# Altium PCB PCB2.PcbDoc
Units mm, origin at the board's own origin, x right, y up, seen from the top; angles counter-clockwise.
Board outline 152.4 x 101.6 mm, 2 copper layers (Top Layer, Bottom Layer); 15 components, 16 nets, 79 pads, 0 vias.
Unrouted connection lines stored in the file: 1.
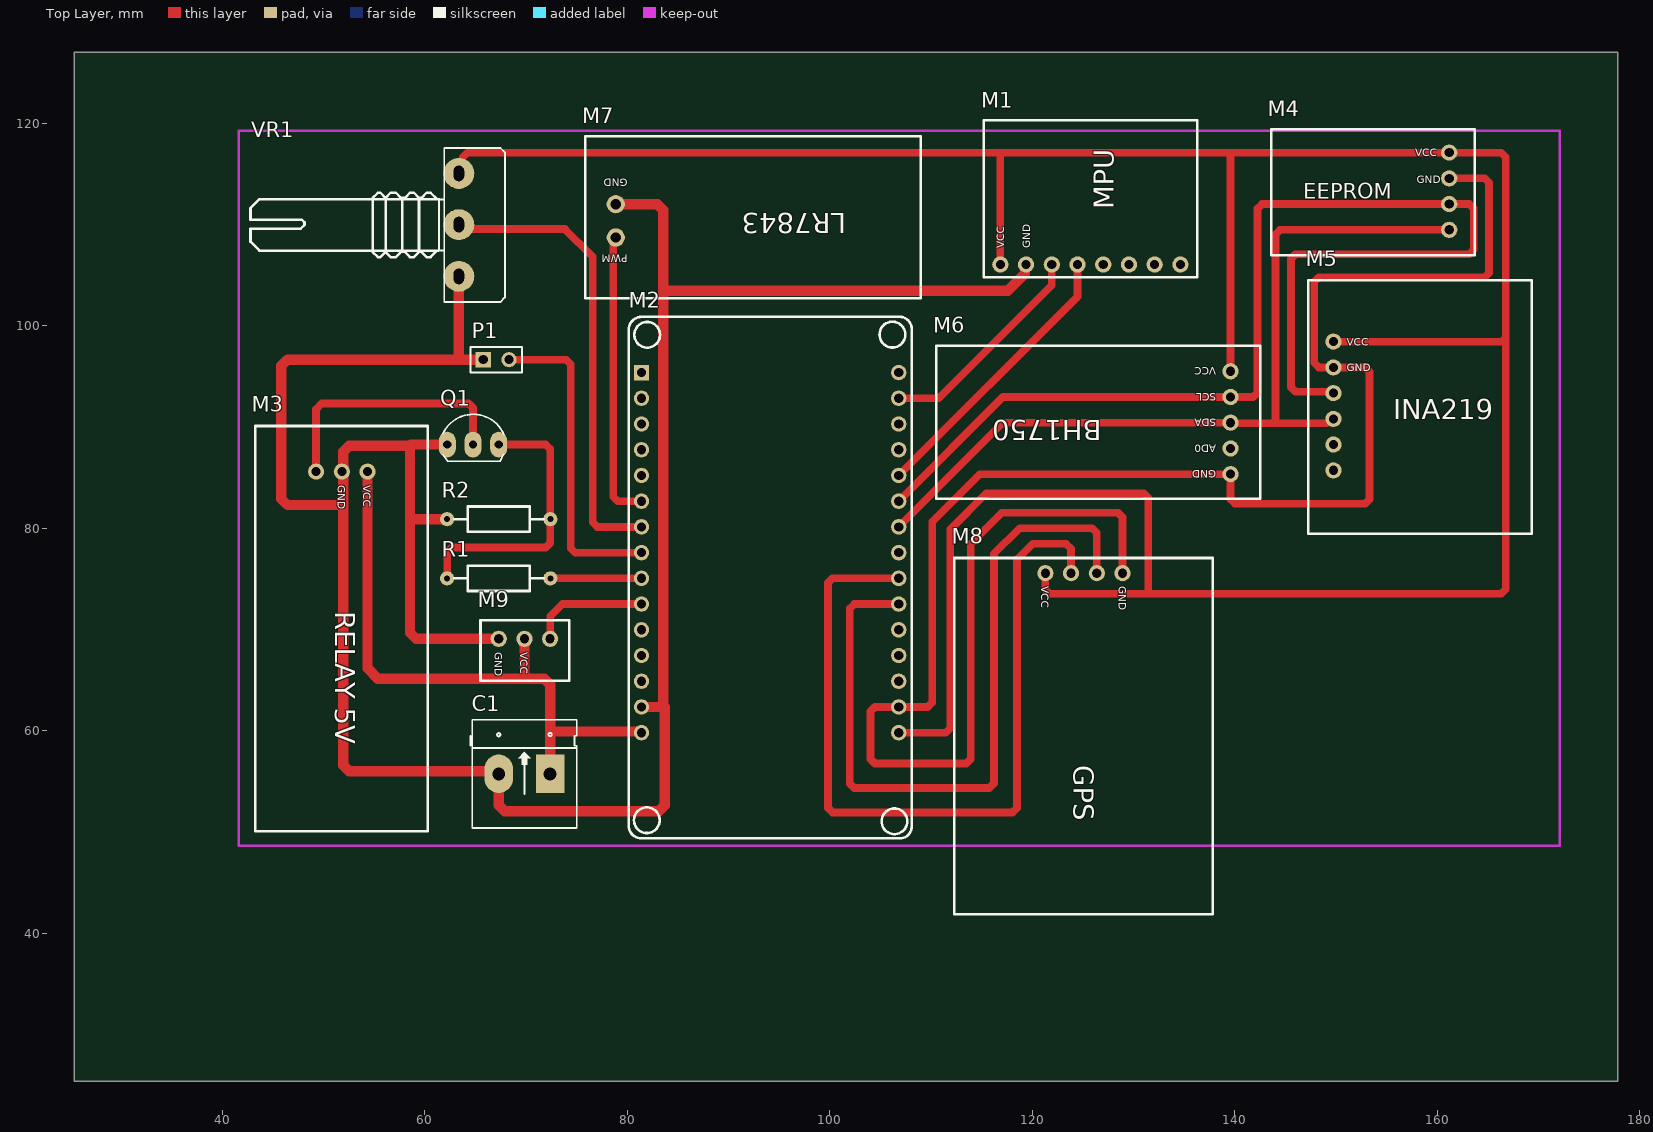
[diagram p0: Top Layer view]
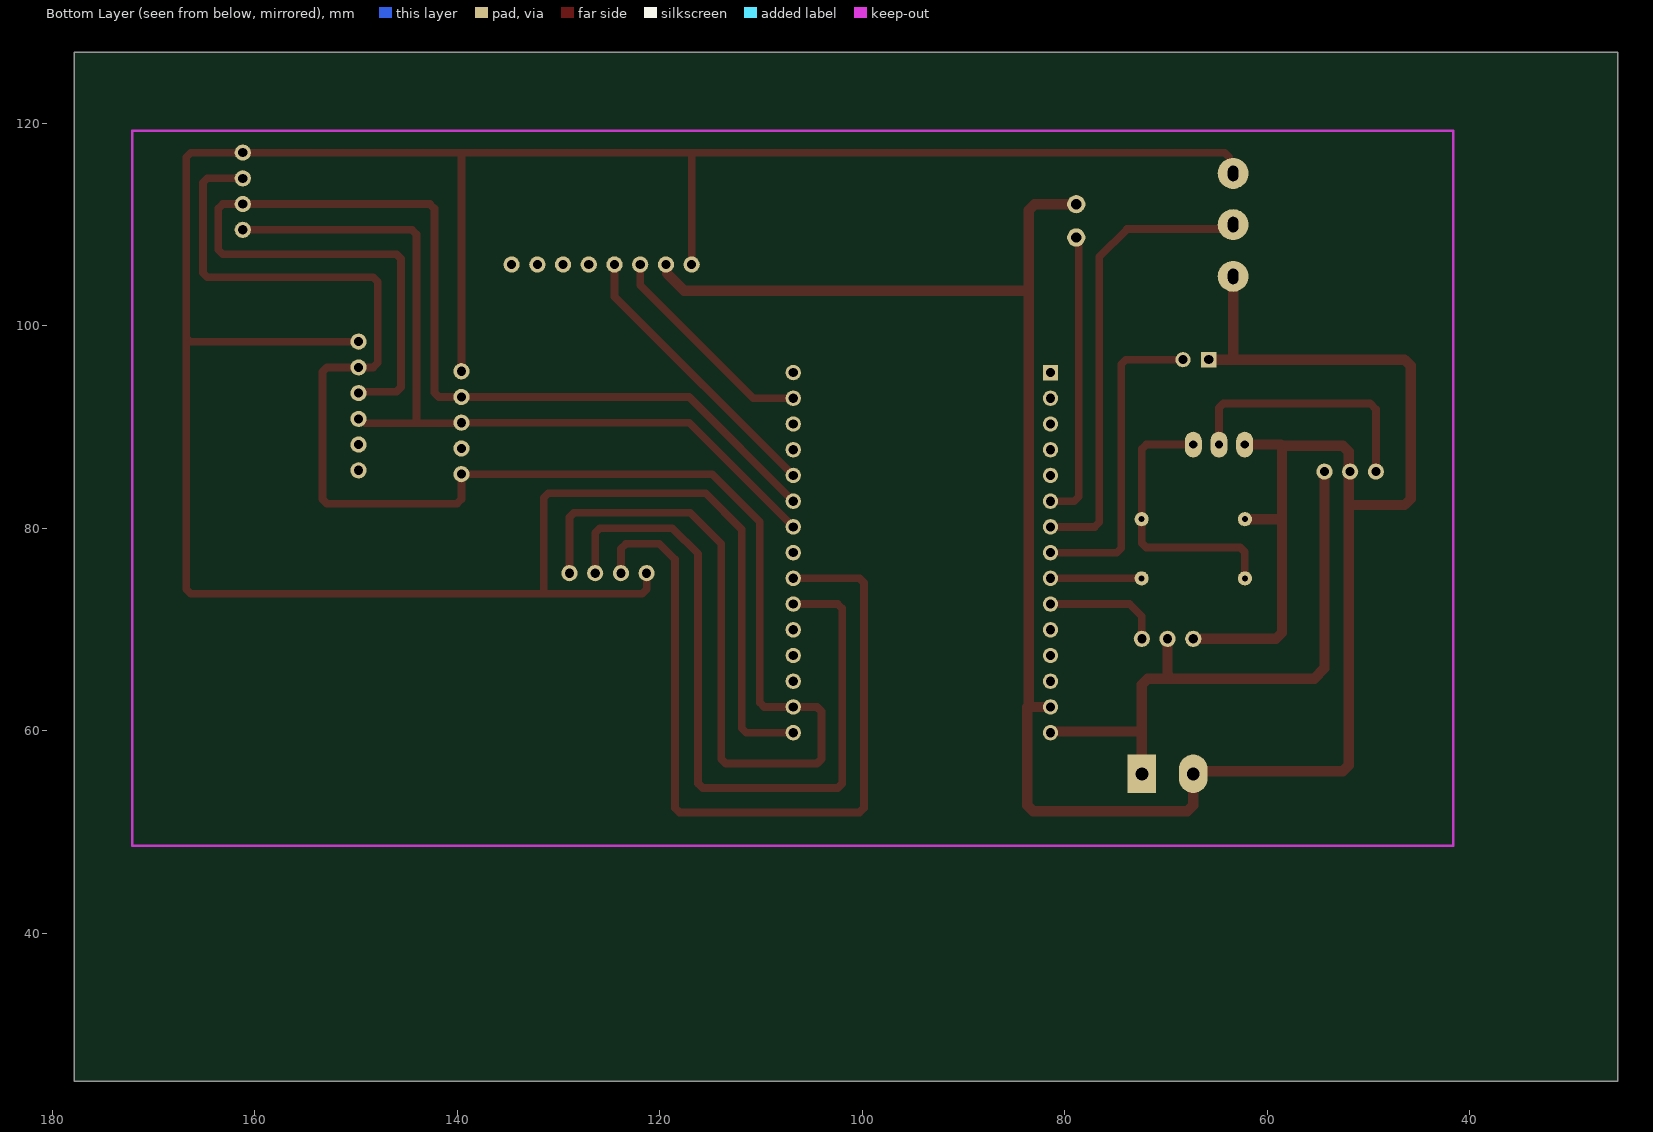
[diagram p1: Bottom Layer view, seen from below]

## Layer stack, top to bottom
Top Solder: solder mask 0.0102, Solder Resist, Dk 3.5
Top Layer: signal copper 0.0356
Dielectric 1: dielectric 0.32, FR-4, Dk 4.8
Bottom Layer: signal copper 0.0356
Bottom Solder: solder mask 0.0102, Solder Resist, Dk 3.5

## Board outline
25.4,25.4 177.8,25.4 177.8,127 25.4,127

## Design rules (kind name [scope] priority, off if disabled: settings)
Clearance [All] p1: gap=0.508 ignorepadtopadclearanceinfootprint=FALSE
PolygonConnect [All] p1: connectstyle=Relief reliefconductorwidth=0.254 reliefentries=4 polygonreliefangle="90 Angle" airgapwidth=0.254
RoutingVias [All] p1: holewidth=0.711 width=1.27 viastyle="Through Hole" minholewidth=0.711 minwidth=1.27 maxholewidth=0.711 maxwidth=1.27
SolderMaskExpansion [All] p1: expansion=0.102 istentingtop=FALSE
Width [All] p1: maxlimit=1.016 minlimit=0.508 preferedwidth=0.762
30 further rules are at their usual default settings.

## Classes and differential pairs
component class ic_xe_dien: C1 M1 M2 M3 M4 M5 M6 M8 M9 P1 Q1 R1 R2 VR1

## Components (designator, comment, footprint, x,y, rotation, side; value= is the part's Value field where it differs from the comment)
C1 "nguon 5V" KF-128_2P 72.39,55.753 r180 top
M1 "module MPU" "MODULE MPU" 136.271,104.775 r90 top
M2 "ESP32-DEVKIT-V1" ESP32 94.646,75.222 r0 top
M3 "module relay 5v" "module relay 5v" 43.285,90.098 r270 top
M4 "module eeprom AT24CXX" "module eeprom at24" 143.599,106.951 r0 top
M5 "module INA219" "module INA219" 147.233,79.48 r0 top
M6 "module BH1750" BH1750 142.494,82.931 r180 top
M7 "module LR7843" "module LR7843" 78.867,110.356 r180 top
M8 "module GPS--GY-NEO6MV2" "module gps" 112.285,77.065 r270 top
M9 "module servo" "module one_wire" 70.336,74.477 r270 top
P1 "den_pha" HDR1X2 65.786,96.647 r0 top
Q1 "C1815" TO92 64.77,88.265 r0 top value=C9014
R1 "330R" "tro vach 1/4w" 67.31,75.057 r0 top
R2 "10k" "tro vach 1/4w" 67.31,80.899 r0 top
VR1 "50K" "Bien Tro Volume Don" 63.373,115.037 r270 top

## Footprints (in the part's own frame and the unit in brackets; to place one, negate y for a bottom-side part, rotate by r counter-clockwise, add the part's x,y. Pads: shape width x height; smd on the part's side, far side on the other; paste and mask are expansions set on the pad)
BH1750 [mm]
  round 1.6 hole 0.9: 1(2.921,-2.413) 2(2.921,-4.953) 3(2.921,-7.493) 4(2.921,-10.033) 5(2.921,-12.573)
  silkscreen extent 0,-15.11 32,0
"Bien Tro Volume Don" [mil] "Volume control single"
  round 120 hole 40 slot 60 at 0 deg: 1(0,0) 2(199,0) 3(400,0)
  silkscreen extent -99,-810 500,179, body extent -110,-818 510,188, height 839
ESP32 [mil]
  rect 60x60 hole 36: 1(-521.12,793.42)
  round 60 hole 36: 2(-521.22,693.52) 3(-521.22,593.52) 4(-521.22,493.52) 5(-521.22,393.52) 6(-521.22,293.52) 7(-521.22,193.52) 8(-521.22,93.52) 9(-521.22,-6.48) 10(-521.22,-106.48) 11(-521.22,-206.48) 12(-521.22,-306.48) 13(-521.22,-406.48) 14(-521.22,-506.48) 15(-521.22,-606.48) 16(478.78,-606.48) 17(478.78,-506.48) 18(478.78,-406.48) 19(478.78,-306.48) 20(478.78,-206.48) 21(478.78,-106.48) 22(478.78,-6.48) 23(478.78,93.52) 24(478.78,193.52) 25(478.78,293.52) 26(478.78,393.52) 27(478.78,493.52) 28(478.78,593.52) 29(478.78,693.52) 30(478.78,793.52)
  silkscreen extent -571,-1018 529,1010, body extent -582,-999 540,1006, height 378
HDR1X2 [mm] "Connector; Header; 2 Position"
  rect 1.5x1.5 hole 0.9: 1(0,0)
  round 1.5 hole 0.9: 2(2.54,0)
  silkscreen extent -1.27,-1.27 3.81,1.27, body extent -1.27,-1.27 3.81,1.27, height 7
KF-128_2P [mm]
  rect 2.794x3.8 hole 1.27: 1(0,0)
  oval 2.794x3.8 hole 1.27: 2(5.08,0)
  silkscreen extent -2.62,-5.33 7.87,5.33, body extent -2.84,-5.13 7.92,5.17, height 14.09
"module eeprom at24" [mm]
  round 1.6 hole 0.9: 1(17.564,10.143) 2(17.564,7.603) 3(17.564,5.063) 4(17.564,2.523)
  silkscreen extent 0,0 20.07,12.45
"module gps" [mm]
  round 1.6 hole 0.9: 1(1.5,16.62) 2(1.5,14.08) 3(1.5,11.54) 4(1.5,9)
  silkscreen extent 0,0 35.18,25.53
"module INA219" [mm]
  round 1.6 hole 0.9: 1(2.5,18.945) 2(2.5,16.405) 3(2.5,13.865) 4(2.5,11.325) 5(2.5,8.785) 6(2.5,6.245)
  silkscreen extent 0,0 22.1,25.02
"module LR7843" [mm]
  round 1.8 hole 1: 1(0,1.644) 2(0,-1.644)
  silkscreen extent -30.12,-8.35 3.01,7.65
"MODULE MPU" [mm]
  round 1.6 hole 0.9: 1(1.27,19.431) 2(1.27,16.891) 3(1.27,14.351) 4(1.27,11.811) 5(1.27,9.271) 6(1.27,6.731) 7(1.27,4.191) 8(1.27,1.651)
  silkscreen extent 0,0 15.49,21.08
"module one_wire" [mm]
  round 1.6 hole 0.9: 1(5.389,2.054) 2(5.389,-0.486) 3(5.389,-3.026)
  silkscreen extent 3.56,-4.83 9.53,3.94
"module relay 5v" [mm]
  round 1.6 hole 0.9: 1(4.5,11.071) 2(4.5,8.531) 3(4.5,5.991)
  silkscreen extent 0,0 40,17.02
TO92 [mil] "TO-92"
  oval 66x100 hole 32: 1(-100,0) 2(0,0) 3(100,0)
  silkscreen extent -117,-65 120,118, body extent -109,-66 109,95, height 245
"tro vach 1/4w" [mm]
  round 1.4 hole 0.6: 1(-5.1,0) 2(5.1,0)
  silkscreen extent -4.39,-1.25 4.42,1.25, body extent -5.38,-1.2 5.38,1.2, height 2.41

## Part data
C1: library part Header2, "Header IDC, 2 x 1 Pin Vertical 2.54mm Pitch (Non-Boxed, Male)", Manufacturer="W¨¹rth Elektronik eiSos GmbH", partNo=613002143121, ComponentLink1 Description=Manufacturer, ComponentLink1URL=http://www.we-online.com, ComponentLink2 Description=Datasheet, ComponentLink2URL=http://katalog.we-online.de/em/datasheet/6130xx143121.pdf, Created by="Karrer Zheng", Created Date="29 March 2013", NoPins=02
M9: library part "module one_wire"
P1: library part "Header 2", "Header, 2-Pin", LatestRevisionDate=17-Jul-2002, LatestRevisionNote="Re-released for DXP Platform.", Publisher="Altium Limited"
Q1: library part "Trans C1815 DIP", "NPN transistor"
R1: library part "Tro Vach 1/4W 5% 330R", "Cắm", Chung_Loai=Cắm, Don_Vi=Con, Ma_Hang=MH007436, So_Chan=2, Ten_Linh_Kien="Trở Vạch 1/4W 5% 330R"
R2: library part "Tro Vach 1/4W 5% 10k", "Căm", Chung_Loai=Cắm, Don_Vi=Con, Ma_Hang=MH007354, So_Chan=2, Ten_Linh_Kien="Trở Vạch 1/4w 5% 10K"
VR1: library part "Triet Ap Don 50k", "Cắm", Chung_Loai=Cắm, Don_Vi=Con, Ma_Hang=MH001419, Ten_Linh_Kien="Triết Áp Đơn B50K"

## Nets (pads, with @x,y where several pads share a name; then routed paths per layer and width w, separated by ;. In a path a pad name is that pad's centre, name@x,y a point inside that pad or via, vN(x,y) a via of type N, cw(c..) or ccw(c..) an arc to the next point about the centre after c; other vN are vias at no path point)
3V3: M1.1 M2.16 M4.1 M5.1 M6.5 M8.4 VR1.1 | length 299
  Top Layer w0.762: 63.754,116.648 64.2,117.094 116.586,117.094 ; M2.16 111.441,59.817 111.887,60.263 111.887,79.883 115.457,83.453 130.999,83.453 131.445,83.007 131.445,73.533 ; M1.1 116.84,116.84 116.586,117.094 ; M8.4 121.285,73.979 121.731,73.533 131.445,73.533 ; M6.5 139.573,116.95 139.429,117.094 ; M5.1 166.37,98.425 166.751,98.806 ; 116.586,117.094 139.429,117.094 ; 131.445,73.533 166.305,73.533 166.751,73.979 166.751,98.425 166.751,98.806 ; 139.429,117.094 M4.1 166.305,117.094 166.751,116.648 166.751,98.806
5V: C1.1 M2.15 M3.1 M9.2 | length 60.1
  Top Layer w1.016: M3.1 54.356,66.167 55.372,65.151 69.469,65.151 ; M9.2 69.85,65.532 69.469,65.151 ; C1.1 72.39,59.944 ; M2.15 81.31,59.914 80.951,59.914 80.921,59.944 72.39,59.944 ; 69.469,65.151 71.795,65.151 72.39,64.556 72.39,59.944
den: M2.8 P1.2 | length 31.6
  Top Layer w0.762: P1.2 73.976,96.647 74.422,96.201 74.422,78.043 74.868,77.597 M2.8
GND: C1.2 M1.2 M2.14 M2.17 M3.2 M4.2 M5.2 M6.1 M7.2 M8.1 M9.3 P1.1 Q1.1 R2.1 VR1.3 | length 447.4
  Top Layer w0.762: 63.373,96.774 63.5,96.647 ; M8.1 128.905,81.088 128.459,81.534 116.967,81.534 113.919,78.486 113.919,57.215 113.473,56.769 104.459,56.769 104.013,57.215 104.013,61.911 104.459,62.357 M2.17 109.663,62.357 110.109,62.803 110.109,80.645 114.808,85.344 M6.1 139.573,82.869 140.019,82.423 152.843,82.423 153.289,82.869 153.289,95.439 152.843,95.885 M5.2 148.274,95.885 147.828,96.331 147.828,104.329 148.274,104.775 164.654,104.775 165.1,105.221 165.1,114.108 164.654,114.554 M4.2
  Top Layer w1.016: M3.2@51.639,85.393 51.639,85.421 M3.2 ; R2.1 58.547,80.899 ; Q1.1 59.69,88.265 58.674,88.265 58.547,88.138 ; 63.373,96.774 VR1.3 ; P1.1 63.5,96.647 46.442,96.647 45.847,96.052 45.847,82.891 46.442,82.296 51.943,82.296 ; M9.3 59.142,69.088 58.547,69.683 58.547,80.899 ; M7.2 82.971,112 83.566,111.405 83.566,103.449 ; M2.14 83.566,62.357 ; M1.2 119.268,105.933 119.268,105.153 117.564,103.449 83.566,103.449 ; 51.943,82.296 51.943,85.393 51.928,85.408 51.928,86.123 51.943,86.138 51.943,87.543 52.538,88.138 58.547,88.138 ; 51.943,82.296 51.943,56.602 52.538,56.007 67.056,56.007 C1.2 67.31,52.665 67.905,52.07 83.098,52.07 83.693,52.665 83.693,62.357 83.566,62.357 ; 58.547,80.899 58.547,88.138 ; 83.566,62.357 83.566,103.449
NetM2_7: M2.7 VR1.2 | length 45.8
  Top Layer w0.762: VR1.2 63.81,109.545 73.843,109.545 76.581,106.807 76.581,80.583 77.027,80.137 M2.7
NetM2_9: M2.9 R1.2 | length 9
  Top Layer w0.762: R1.2 M2.9
NetM3_3: M3.3 Q1.2 | length 25.7
  Top Layer w0.762: M3.3 49.276,91.756 49.849,92.329 64.324,92.329 64.77,91.883 Q1.2
NetQ1_3: Q1.3 R1.1 R2.2 | length 27.6
  Top Layer w0.762: R1.1 62.23,75.077 62.23,77.659 62.676,78.105 71.964,78.105 72.41,78.551 72.41,87.819 71.964,88.265 Q1.3@67.437,88.265
pwm_motor: M2.6 M7.1 | length 28.7
  Top Layer w0.762: M7.1 78.867,108.431 78.613,108.177 78.613,83.123 79.059,82.677 M2.6
RX_GPS: M2.22 M8.3 | length 81.6
  Top Layer w0.762: M2.22 100.268,75.057 99.822,74.611 99.822,52.389 100.268,51.943 118.045,51.943 118.491,52.389 118.491,76.944 120.033,78.486 123.317,78.486 123.825,77.978 M8.3
SCL: M2.25 M4.3 M5.3 M6.4 | length 119.3
  Top Layer w0.762: M2.25 117.094,92.964 M6.4 141.794,92.964 142.24,93.41 142.24,111.568 142.686,112.014 M4.3 163.13,112.014 163.576,111.568 163.576,107.507 163.13,107.061 145.988,107.061 145.542,106.615 145.542,93.918 145.988,93.472 149.606,93.472 M5.3
SCL_MPU: M1.3 M2.29 | length 21.8
  Top Layer w0.762: M2.29 110.744,92.837 121.92,104.013 M1.3
SDA: M2.24 M4.4 M5.4 M6.3 | length 83.3
  Top Layer w0.762: M2.24 117.094,90.424 M6.3 139.636,90.361 149.062,90.361 149.506,90.805 M5.4 ; 144.018,90.424 144.018,109.028 144.464,109.474 M4.4
SDA_MPU: M1.4 M2.26 | length 28.1
  Top Layer w0.762: M2.26 124.46,102.87 M1.4
servo_den: M2.10 M9.1 | length 11.7
  Top Layer w0.762: M9.1 72.39,71.309 73.598,72.517 M2.10
TX_GPS: M2.21 M8.2 | length 74.9
  Top Layer w0.762: M2.21 102.427,72.517 101.981,72.071 101.981,54.802 102.427,54.356 115.759,54.356 116.205,54.802 116.205,77.47 118.745,80.01 125.919,80.01 126.365,79.564 M8.2
pads on no net: M1.5 M1.6 M1.7 M1.8 M2.1 M2.2 M2.3 M2.4 M2.5 M2.11 M2.12 M2.13 M2.18 M2.19 M2.20 M2.23 M2.27 M2.28 M2.30 M5.5 M5.6 M6.2

## Keep-outs
Keep-Out Layer:
  lines w0.254: 41.656,48.641 41.656,119.253 172.085,119.253 172.085,48.641 41.656,48.641

## Text inside footprints (layer, text, board x,y; h text height)
M1: Top Overlay "GND" at 119.783,107.666 h0.76 r90; Top Overlay "VCC" at 117.243,107.666 h0.76 r90; Top Overlay "MPU" at 128.016,111.506 h2 r90
M2: Mechanical 15 "ESP32" at 90.3,89.278 h2.03; Mechanical 15 "devikit" at 90.317,85.469 h2.03 r1; Mechanical 15 "V1" at 92.84,81.658 h2.03
M3: Top Overlay "GND" at 51.413,84.256 h0.76 r270; Top Overlay "VCC" at 53.953,84.256 h0.76 r270; Top Overlay "RELAY 5V" at 51.159,71.81 h2 r270
M4: Top Overlay "GND" at 157.95,114.063 h0.76; Top Overlay "VCC" at 157.823,116.73 h0.76; Top Overlay "EEPROM" at 146.774,112.539 h1.5
M5: Top Overlay "VCC" at 151.043,98.022 h0.76; Top Overlay "GND" at 151.043,95.482 h0.76; Top Overlay "INA219" at 155.615,90.783 h2
M6: Top Overlay "BH1750" at 126.873,90.678 h2 r180; Top Overlay "GND" at 138.176,85.725 h0.76 r180; Top Overlay "AD0" at 138.176,88.265 h0.76 r180; Top Overlay "SDA" at 138.176,90.805 h0.76 r180; Top Overlay "SCL" at 138.176,93.345 h0.76 r180; Top Overlay "VCC" at 138.176,95.885 h0.76 r180
M7: Top Overlay "LR7843" at 101.6,111.118 h2 r180; Top Overlay "GND" at 80.029,114.516 h0.76 r180; Top Overlay "PWM" at 80.029,107.023 h0.76 r180
M8: Top Overlay "GPS" at 124.096,56.618 h2 r270; Top Overlay "VCC" at 120.888,74.272 h0.76 r270; Top Overlay "GND" at 128.541,74.271 h0.76 r270
M9: Top Overlay "GND" at 66.907,67.746 h0.76 r270; Top Overlay "VCC" at 69.447,67.746 h0.76 r270